# Altium PCB 8_1000M_Switch_VT1.1.PcbDoc (part 2 of 3)
Units mil, origin at the board's own origin, x right, y up, seen from the top; angles counter-clockwise.
Board outline 6257.04 x 4516.14 mil, 2 copper layers (Top Layer, Bottom Layer); 180 components, 239 nets, 766 pads, 500 vias.
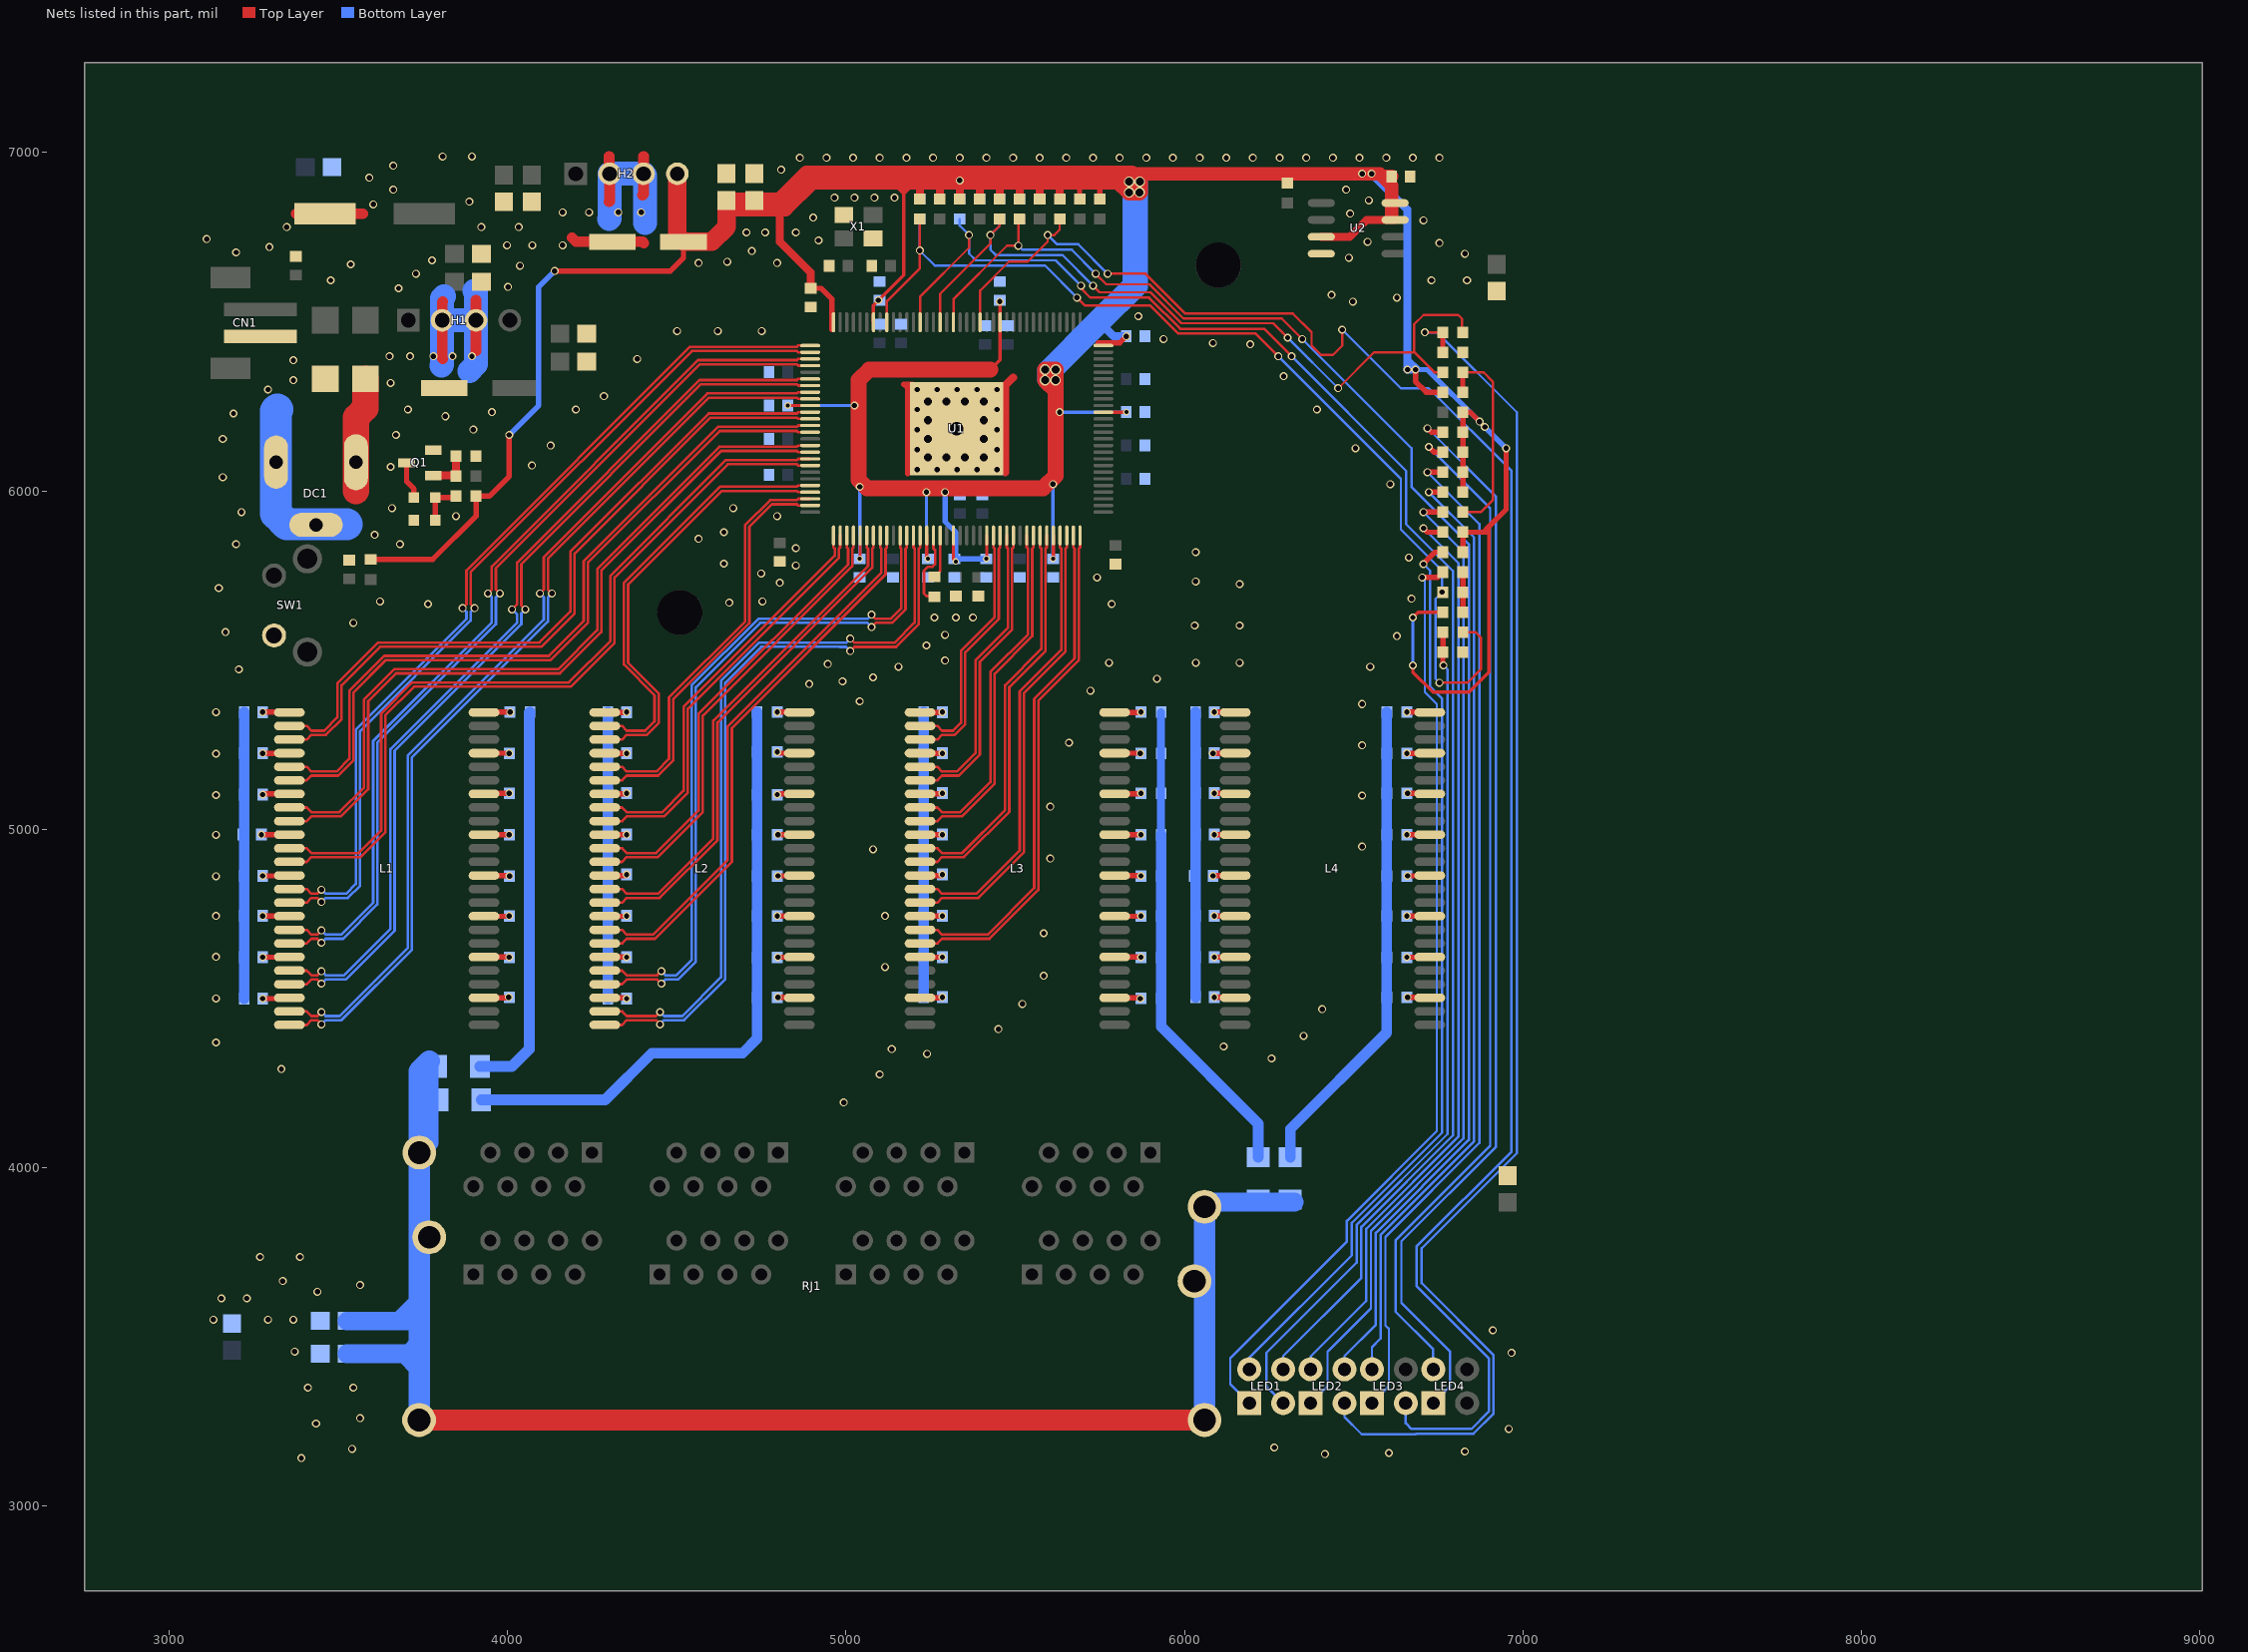
[diagram p2: the nets of this part, all layers, seen from the top]

## Via types
v1: diameter 23.62, hole 15.75, Top Layer to Bottom Layer, 457 vias
v2: diameter 31.5, hole 23.62, Top Layer to Bottom Layer, 28 vias
v3: diameter 19.68, hole 11.81, Top Layer to Bottom Layer, 15 vias

## Nets (pads, with @x,y where several pads share a name; then routed paths per layer and width w, separated by ;. In a path a pad name is that pad's centre, name@x,y a point inside that pad or via, vN(x,y) a via of type N, cw(c..) or ccw(c..) an arc to the next point about the centre after c; other vN are vias at no path point) (continued)
3.3V: C39.2 C46.2 C47.2 C48.1 C52.2 C53.2 C54.2 C55.2 C56.2 C57.2 C58.2 C59.2 C60.2 C61.2 C81.2 H2.4 R33.1 R35.1 R37.1 R38.1 R39.1 R40.1 R41.2 R42.2 R44.2 R45.2 R46.2 R49.2 R50.2 R51.2 R52.2 R53.2 R54.1 R57.1 R63.1 R67.2 R68.2 R69.2 R70.2 U1.5 U1.15 U1.19 U1.24 U1.34 U1.54 U1.64 U1.77 U1.96 U1.102 U1.112 U2.3 U2.7 U2.8 | length 15878
  Top Layer w9.84: v3(4827.9,6252.36) 4893.81,6252.36 U1.112@4893.93,6252.48 ; v3(5040.5,5799.61) 5041.57,5800.67 U1.5@5041.57,5868.62 ; U1.96@5080.94,6498.54 5080.94,6548.7 v1(5095.62,6563.39) 5170.42,6638.19 5170.42,6877.97 5170.61,6878.16 ; 5118.86,6937.4 5142.48,6913.78 5142.48,6906.29 5170.61,6878.16 ; 5152.26,6913.78 5174.36,6891.68 ; 5179.91,6913.78 5174.36,6908.23 5174.36,6891.68 ; 5206.23,6913.78 5174.36,6881.91 ; U1.15@5238.42,5868.62 5238.42,5802.48 v3(5241.29,5799.61) ; U1.19@5317.16,5868.62 5317.16,5798.54 v3(5323.96,5791.73) ; v3(5414.52,5799.61) 5415.58,5800.67 U1.24@5415.58,5868.62 ; 5426.33,6358.66 5454.95,6387.28 U1.77@5454.95,6498.54 5454.95,6558.39 v1(5453.89,6559.45) ; v3(5611.37,5799.61) 5612.43,5800.67 U1.34@5612.43,5868.62 ; U1.54@5760.07,6232.79 5827.79,6232.79 v3(5827.9,6232.68) ; v1(6674.36,5484.65) 6674.36,5464.96 6733.41,5405.91 6839.71,5405.91 6898.77,5464.96 6898.77,5894.1 ; v1(6674.36,5626.38) 6690.11,5642.13 R63.1@6762.81,5642.13 ; 5170.61,6878.16 5174.36,6881.91 ; 5174.36,6881.91 5164.58,6891.68 5174.36,6891.68
  Top Layer w15.75: R42.2@3595.62,5797.77 3778.82,5797.77 3906.91,5925.86 R54.1@3906.91,5984.65 3946.01,5984.65 4005.07,6043.7 v1(4005.07,6165.75) ; v1(4138.92,6650) 4481.44,6650 4519.64,6688.19 C48.1@4519.64,6736.62 ; C46.2@4729.48,6835.04 C46.2@4729.48,6858.66 ; 4804.28,6835.04 4804.28,6858.66 ; C53.2@4894.83,6598.82 4926.33,6598.82 4957.82,6567.32 4957.82,6476.77 ; 5324.34,6913.78 v1@5328.28,6917.72 ; R69.2@5690.1,6862.72 5690.1,6913.78 5690.1,6935.64 5691.86,6937.4 ; 5744.61,6913.78 5749.16,6909.24 R68.2@5749.16,6862.72 ; 5745.22,6437.4 5808.22,6437.4 v1(5827.9,6457.09) ; v1(6682.23,6358.66) 6682.23,6323.23 6713.73,6291.73 R57.1@6762.54,6291.73 ; R33.1@6822.13,5819.29 R35.1@6822.13,5878.35 6883.02,5878.35 ; R37.1@6822.13,5996.46 R38.1@6822.13,6055.51 R39.1@6822.13,6114.57 R40.1@6822.13,6173.62 R67.2@6822.13,6232.68 6843.65,6232.68 v1(6871.21,6205.12) ; 6896.86,5878.35 6883.02,5878.35 ; v1(6949.95,6126.38) 6949.95,5945.28 6898.77,5894.1 6883.02,5878.35
  Top Layer w23.62: 4804.28,6835.04 4804.28,6736.62 4894.83,6646.06 C53.2@4894.83,6598.82 ; 5206.23,6913.78 5217.67,6902.35 R52.2@5217.67,6862.86 ; 5265.29,6913.78 5276.72,6902.35 R50.2@5276.72,6862.86 ; 5324.34,6913.78 5335.78,6902.35 R51.2@5335.78,6862.86 ; 5383.4,6913.78 5394.83,6902.35 R53.2@5394.83,6862.86 ; 5442.46,6913.78 5453.89,6902.35 R49.2@5453.89,6862.86 ; 5501.51,6915.35 5503.08,6913.78 5512.94,6903.92 R46.2@5512.94,6864.44 ; 5560.57,6913.78 5572,6902.35 R45.2@5572,6862.86 ; 5619.62,6913.78 5631.05,6902.35 R44.2@5631.05,6862.86 ; U2.3@6403.97,6750.99 6487.94,6750.99 6537.94,6800.99 U2.7@6621.91,6800.99 U2.7@6611.37,6811.53 ; 6611.37,6901.97 C39.2@6611.37,6929.53
  Top Layer w39.37: 5844.11,6937.4 v1(6524.75,6937.4) v1(6552.31,6937.4) 6575.93,6937.4 6583.81,6929.53 ; U2.7@6611.37,6811.53 6611.37,6901.97 6583.81,6929.53 ; C39.2@6611.37,6929.53 6583.81,6929.53
  Top Layer w47.24: 5426.33,6358.66 5068.06,6358.66 5036.56,6327.17 5036.56,6033.47 5061.76,6008.27 5582.23,6008.27 5619.24,6045.28 5619.24,6295.67 ; 5619.24,6295.67 v2(5619.24,6358.66) v2(5587.74,6358.66) v2(5587.74,6327.17) 5619.24,6295.67 ; C47.2@4646.8,6833.21 4648.63,6835.04 4729.48,6835.04 4804.28,6835.04 4820.03,6835.04 4898.77,6913.78 5142.48,6913.78 5152.26,6913.78 5179.91,6913.78 5206.23,6913.78 5265.29,6913.78 5324.34,6913.78 5383.4,6913.78 5442.46,6913.78 5503.08,6913.78 5560.57,6913.78 5690.1,6913.78 5744.61,6913.78 5804.74,6913.78 v2(5836.23,6882.29) v2(5867.27,6882.29) 5867.73,6882.74 v2(5867.73,6913.78) 5844.11,6937.4 5691.86,6937.4 5118.86,6937.4 4883.02,6937.4 4804.28,6858.66 C46.2@4729.48,6858.66 C47.2@4646.8,6858.66 C47.2@4646.8,6833.21
  Top Layer w55.12: H2.4@4501.52,6937.4 4501.52,6754.73 C48.1@4519.64,6736.62 4603.49,6736.62 4646.8,6779.92 C47.2@4646.8,6833.21
  Bottom Layer w9.84: v3(4827.9,6252.36) v1(5024.75,6252.36) ; v3(5040.5,5799.61) v1(5040.5,6012.21) ; v1(5095.62,6563.39) C54.2@5099.56,6559.45 ; v1(5237.35,5996.46) 5237.35,5803.54 v3(5241.29,5799.61) ; v3(5611.37,5799.61) v1(5611.37,6020.08) ; v1(5631.05,6232.68) v3(5827.9,6232.68) ; 5738.17,6509.09 5755.88,6491.37 ; v1(6674.36,5484.65) v1(6674.36,5626.38)
  Bottom Layer w15.75: v1(4005.07,6165.75) 4091.68,6252.36 4091.68,6602.76 v1(4138.92,6650) ; v1(5292.47,5996.46) 5292.47,5909.84 5323.96,5878.35 C58.2@5323.96,5799.61 ; C58.2@5320.03,5799.61 C58.2@5323.96,5799.61 ; v3(5323.96,5791.73) C58.2@5323.96,5799.61 ; R70.2@5335.77,6862.72 v1(5335.77,6917.72) ; v3(5414.52,5799.61) C58.2@5323.96,5799.61 ; 6658.61,6391.6 v1@6691.55,6358.66 ; v1(6682.23,6358.66) v1@6691.55,6358.66 ; v1@6949.95,6126.38 v1(6886.96,6189.37) v1(6871.21,6205.12) 6717.67,6358.66 v1@6691.55,6358.66
  Bottom Layer w23.62: 5755.88,6491.37 5790.16,6457.09 v1(5827.9,6457.09) ; v1(6524.75,6937.4) v1(6552.31,6937.4) 6658.61,6831.1 6658.61,6391.6 v1(6658.61,6358.66) v1(6682.23,6358.66)
  Bottom Layer w47.24: v2(5587.74,6327.17) v2(5587.74,6358.66) 5738.17,6509.09 5839.71,6610.63 5839.71,6878.81 v2(5836.23,6882.29) v2(5836.23,6913.78) v2(5867.73,6913.78) 5867.73,6603.22 5755.88,6491.37 5623.18,6358.66 v2(5619.24,6358.66) 5619.24,6327.62 v2(5618.78,6327.17) v2(5587.74,6327.17)
$1N104220: R43.1 U1.17 | length 129
  Top Layer w7.87: R43.1@5260.97,5746.59 5277.79,5763.4 U1.17@5277.79,5868.62
$1N185587: R36.1 R57.2 R59.2 | length 612.6
  Top Layer w7.09: R36.1@6822.13,5937.4 6875.15,5937.4 6910.58,5972.84 6910.58,6323.23 6883.02,6350.79 R59.2@6822.13,6350.79
  Top Layer w15.75: R57.2@6821.86,6291.73 6821.86,6350.52 R59.2@6822.13,6350.79
$1N185642: LED2.2 R58.1 R60.1 | length 4172.9
  Top Layer w7.09: v1(6709.79,6468.9) R60.1@6762.81,6468.9
  Top Layer w15.75: R58.1@6762.81,6409.84 R60.1@6762.81,6468.9
  Bottom Layer w7.09: LED2.2@6472.39,3304.72 6472.39,3263.75 6523.15,3212.99 6682.23,3212.99 6683.81,3214.57 6853.46,3214.57 6912.94,3274.05 6912.94,3446.85 6699.95,3659.84 6699.95,3762.2 6981.45,4043.7 6981.45,6232.68 6745.23,6468.9 v1(6709.79,6468.9)
$1N185934: R34.1 R63.2 R64.2 | length 118.1
  Top Layer w15.75: R63.2@6822.13,5642.13 R64.2@6822.13,5701.18 R34.1@6822.13,5760.24
$1N185939: LED1.2 R65.1 R66.1 | length 2526.7
  Top Layer w15.75: R66.1@6763.07,5583.07 6763.07,5524.28 R65.1@6762.81,5524.02 6762.81,5486.75 v1(6764.91,5484.65)
  Bottom Layer w7.09: LED1.2@6291.29,3304.72 6241.29,3354.72 6241.29,3453.15 6508.06,3719.92 6508.06,3831.38 6776.72,4100.04 6776.72,5472.84 v1(6764.91,5484.65)
$3N11717: L1.42 R3.1 | length 75.5
  Top Layer w15.75: L1.42@3930.26,5104.93 3932.02,5106.69 v1(4005.07,5106.69)
$3N11718: L1.39 R4.1 | length 74.9
  Top Layer w15.75: L1.39@3930.26,4984.43 4004.85,4984.43 v1(4005.07,4984.65)
$3N11719: L1.36 R5.1 | length 76.2
  Top Layer w15.75: L1.36@3930.26,4863.93 4004.18,4863.93 v1(4005.79,4862.32)
$3N11720: L1.33 R6.1 | length 75.2
  Top Layer w15.75: L1.33@3930.26,4743.43 4004.01,4743.43 v1(4005.07,4744.49)
$3N11721: L1.30 R7.1 | length 75
  Top Layer w15.75: L1.30@3930.26,4623.03 4004.47,4623.03 v1(4005.07,4622.44)
$3N11722: L1.27 R8.1 | length 73.7
  Top Layer w15.75: L1.27@3930.26,4502.53 4001.43,4502.53 v1(4003.23,4504.33)
$3N11723: L2.48 R9.1 | length 65.6
  Top Layer w15.75: v1(4796.67,5346.85) 4860.82,5346.85 L2.48@4861.83,5345.83
$3N11724: L2.45 R10.1 | length 66.6
  Top Layer w15.75: v1(4796.67,5228.74) 4800.08,5225.33 L2.45@4861.83,5225.33
$3N11725: L2.42 R11.1 | length 66.1
  Top Layer w15.75: v1(4796.67,5102.76) 4798.85,5104.93 L2.42@4861.83,5104.93
$3N11726: L2.39 R12.1 | length 63.4
  Top Layer w15.75: v1(4798.51,4984.65) 4861.62,4984.65 L2.39@4861.83,4984.43
$3N11727: L2.36 R13.1 | length 63.9
  Top Layer w15.75: v1(4798.51,4862.6) 4860.5,4862.6 L2.36@4861.83,4863.93
$3N11728: L2.33 R14.1 | length 65.6
  Top Layer w15.75: v1(4796.67,4744.49) 4860.78,4744.49 L2.33@4861.83,4743.43
$3N11729: L2.30 R15.1 | length 63.6
  Top Layer w15.75: v1(4798.51,4622.44) 4861.24,4622.44 L2.30@4861.83,4623.03
$3N11730: L2.27 R16.1 | length 64.1
  Top Layer w15.75: v1(4798.51,4504.33) 4860.04,4504.33 L2.27@4861.83,4502.53
$3N11731: L3.48 R17.1 | length 78.3
  Top Layer w15.75: L3.48@5793.29,5345.83 5870.19,5345.83 v1(5871.21,5346.85)
$3N11732: L3.45 R18.1 | length 76.3
  Top Layer w15.75: L3.45@5793.29,5225.33 5868.84,5225.33 v1(5869.37,5224.8)
$3N11733: L3.42 R19.1 | length 78.6
  Top Layer w15.75: L3.42@5793.29,5104.93 5869.45,5104.93 v1(5871.21,5106.69)
$3N11734: L3.39 R20.1 | length 78
  Top Layer w15.75: L3.39@5793.29,4984.43 5871,4984.43 v1(5871.21,4984.65)
$3N11735: L3.36 R21.1 | length 78.5
  Top Layer w15.75: L3.36@5793.29,4863.93 5869.87,4863.93 v1(5871.21,4862.6)
$3N11736: L3.33 R22.1 | length 78.4
  Top Layer w15.75: L3.33@5793.29,4743.43 5870.15,4743.43 v1(5871.21,4744.49)
$3N11737: L3.30 R23.1 | length 78.2
  Top Layer w15.75: L3.30@5793.29,4623.03 5870.62,4623.03 v1(5871.21,4622.44)
$3N11738: L3.27 R24.1 | length 77
  Top Layer w15.75: L3.27@5793.29,4502.53 5867.23,4502.53 v1(5869.37,4500.39)
$3N11739: L4.48 R25.1 | length 68
  Top Layer w15.75: v1(6656.78,5346.85) 6723.38,5346.85 L4.48@6724.4,5345.83
$3N11740: L4.45 R26.1 | length 67.8
  Top Layer w15.75: v1(6656.78,5224.8) 6723.87,5224.8 L4.45@6724.4,5225.33
$3N11741: L4.42 R27.1 | length 66.5
  Top Layer w15.75: v1(6658.61,5106.69) 6722.64,5106.69 L4.42@6724.4,5104.93
$3N11742: L4.39 R28.1 | length 67.7
  Top Layer w15.75: v1(6656.78,4984.65) 6724.18,4984.65 L4.39@6724.4,4984.43
$3N11743: L4.36 R29.1 | length 66.3
  Top Layer w15.75: v1(6658.61,4862.6) 6723.06,4862.6 L4.36@6724.4,4863.93
$3N11744: L4.33 R30.1 | length 68.1
  Top Layer w15.75: v1(6656.78,4744.49) 6723.34,4744.49 L4.33@6724.4,4743.43
$3N11745: L4.30 R31.1 | length 67.9
  Top Layer w15.75: v1(6656.78,4622.44) 6723.8,4622.44 L4.30@6724.4,4623.03
$3N11746: L4.27 R32.1 | length 66.5
  Top Layer w15.75: v1(6658.61,4504.33) 6722.6,4504.33 L4.27@6724.4,4502.53
$3N11843: L1.48 R1.1 | length 77.7
  Top Layer w15.75: L1.48@3930.26,5345.83 3931.01,5346.58 v1(4007.63,5346.58)
$3N11844: L1.45 R2.1 | length 75
  Top Layer w15.75: L1.45@3930.26,5225.33 4004.54,5225.33 v1(4005.07,5224.8)
$3N11846: M.1 R1.2 R2.2 R3.2 R4.2 R5.2 R6.2 R7.2 R8.2 | length 1164.4
  Bottom Layer w31.5: M.1@3917.87,4299.61 4012.94,4299.61 4064.39,4351.05 R8.2@4064.39,4504.33 R7.2@4064.39,4622.44 R6.2@4064.39,4744.49 R5.2@4064.39,4862.6 R4.2@4064.39,4984.65 R3.2@4064.39,5106.69 R2.2@4064.39,5224.8 4064.39,5345.02 R1.2@4066.22,5346.85
$3N11848: C2.1 R17.2 R18.2 R19.2 R20.2 R21.2 R22.2 R23.2 R24.2 | length 1434.5
  Bottom Layer w23.62: R20.2@5930.53,4984.65 R19.2@5930.53,5106.69 R18.2@5930.53,5224.8 R17.2@5930.53,5346.85
  Bottom Layer w31.5: R20.2@5930.53,4984.65 R21.2@5930.53,4862.6 R22.2@5930.53,4744.49 R23.2@5930.53,4622.44 R24.2@5930.53,4500.39 5930.53,4417.45 6217.67,4130.32 C2.1@6217.67,4031.31
$3N11849: C5.2 L1.1 | length 79.2
  Top Layer w15.75: v1(3276.72,5346.85) 3354.45,5346.85 L1.1@3355.46,5345.83
$3N11850: C6.2 L1.4 | length 79
  Top Layer w15.75: v1(3276.72,5224.8) 3354.93,5224.8 L1.4@3355.46,5225.33
$3N11851: C7.2 L1.7 | length 79.6
  Top Layer w15.75: v1(3276.72,5102.76) 3278.9,5104.93 L1.7@3355.46,5104.93
$3N11852: C8.2 L1.10 | length 82.8
  Top Layer w15.75: v1(3272.78,4984.65) 3355.25,4984.65 L1.10@3355.46,4984.43
$3N11853: C9.2 L1.13 | length 79.3
  Top Layer w15.75: v1(3276.72,4862.6) 3354.13,4862.6 L1.13@3355.46,4863.93
$3N11854: C10.2 L1.16 | length 79.2
  Top Layer w15.75: v1(3276.72,4744.49) 3354.41,4744.49 L1.16@3355.46,4743.43
$3N11855: C11.2 L1.19 | length 79
  Top Layer w15.75: v1(3276.72,4622.44) 3354.87,4622.44 L1.19@3355.46,4623.03
$3N11856: C12.2 L1.22 | length 79.6
  Top Layer w15.75: v1(3276.72,4500.39) 3353.32,4500.39 L1.22@3355.46,4502.53
$3N11857: C13.2 L2.1 | length 64.9
  Top Layer w15.75: L2.1@4287.03,5345.83 4350.51,5345.83 v1(4351.52,5346.85)
$3N11858: C14.2 L2.4 | length 64.7
  Top Layer w15.75: L2.4@4287.03,5225.33 4287.56,5224.8 v1(4351.52,5224.8)
$3N11859: C15.2 L2.7 | length 65.2
  Top Layer w15.75: L2.7@4287.03,5104.93 4349.76,5104.93 v1(4351.52,5106.69)
$3N11860: C16.2 L2.10 | length 64.6
  Top Layer w15.75: L2.10@4287.03,4984.43 4287.25,4984.65 v1(4351.52,4984.65)
$3N11861: C17.2 L2.13 | length 65.6
  Top Layer w15.75: L2.13@4287.03,4863.93 4348.92,4863.93 v1(4351.52,4866.54)
$3N11862: C18.2 L2.16 | length 64.9
  Top Layer w15.75: L2.16@4287.03,4743.43 4350.47,4743.43 v1(4351.52,4744.49)
$3N11863: C19.2 L2.19 | length 64.7
  Top Layer w15.75: L2.19@4287.03,4623.03 4350.93,4623.03 v1(4351.52,4622.44)
$3N11864: C20.2 L2.22 | length 65.4
  Top Layer w15.75: L2.22@4287.03,4502.53 4349.38,4502.53 v1(4351.52,4500.39)
$3N11865: C21.2 L3.1 | length 66.5
  Top Layer w15.75: L3.1@5218.49,5345.83 5283.58,5345.83 v1(5284.59,5346.85)
$3N11866: C22.2 L3.4 | length 66.3
  Top Layer w15.75: L3.4@5218.49,5225.33 5219.02,5224.8 v1(5284.59,5224.8)
$3N11867: C23.2 L3.7 | length 66.8
  Top Layer w15.75: L3.7@5218.49,5104.93 5282.83,5104.93 v1(5284.59,5106.69)
$3N11868: C24.2 L3.10 | length 66.2
  Top Layer w15.75: L3.10@5218.49,4984.43 5284.38,4984.43 v1(5284.59,4984.65)
$3N11869: C25.2 L3.13 | length 67.2
  Top Layer w15.75: L3.13@5218.49,4863.93 5281.99,4863.93 v1(5284.59,4866.54)
$3N11870: C26.2 L3.16 | length 66.5
  Top Layer w15.75: L3.16@5218.49,4743.43 5219.55,4744.49 v1(5284.59,4744.49)
$3N11871: C27.2 L3.19 | length 66.3
  Top Layer w15.75: L3.19@5218.49,4623.03 5219.08,4622.44 v1(5284.59,4622.44)
$3N11872: C28.2 L3.22 | length 66.8
  Top Layer w15.75: L3.22@5218.49,4502.53 5282.8,4502.53 v1(5284.59,4504.33)
$3N11873: C29.2 L4.1 | length 62.3
  Top Layer w15.75: v1(6087.75,5346.85) 6148.58,5346.85 L4.1@6149.6,5345.83
$3N11874: C30.2 L4.4 | length 66
  Top Layer w15.75: v1(6083.81,5224.8) 6149.07,5224.8 L4.4@6149.6,5225.33
$3N11875: C31.2 L4.7 | length 62.6
  Top Layer w15.75: v1(6087.75,5106.69) 6147.83,5106.69 L4.7@6149.6,5104.93
$3N11876: C32.2 L4.10 | length 61.9
  Top Layer w15.75: v1(6087.75,4984.65) 6149.38,4984.65 L4.10@6149.6,4984.43
$3N11877: C33.2 L4.13 | length 66.3
  Top Layer w15.75: v1(6083.81,4862.6) 6085.14,4863.93 L4.13@6149.6,4863.93
$3N11878: C34.2 L4.16 | length 62.3
  Top Layer w15.75: v1(6087.74,4744.49) 6148.54,4744.49 L4.16@6149.6,4743.43
$3N11879: C35.2 L4.19 | length 62.1
  Top Layer w15.75: v1(6087.75,4622.44) 6149,4622.44 L4.19@6149.6,4623.03
$3N11880: C36.2 L4.22 | length 62.6
  Top Layer w15.75: v1(6087.75,4504.33) 6147.8,4504.33 L4.22@6149.6,4502.53
$3N11884: C4.2 R9.2 R10.2 R11.2 R12.2 R13.2 R14.2 R15.2 R16.2 | length 1854.8
  Bottom Layer w31.5: C4.2@3922.1,4201.18 4288.53,4201.18 4426.33,4338.98 4694.04,4338.98 4737.35,4382.28 R16.2@4737.35,4504.33 R15.2@4737.35,4622.44 R14.2@4737.35,4744.49 R13.2@4737.35,4862.6 R12.2@4737.35,4984.65 R11.2@4737.35,5102.76 R10.2@4737.35,5228.74 R9.2@4737.35,5346.85
$3N11885: C80.2 R25.2 R26.2 R27.2 R28.2 R29.2 R30.2 R31.2 R32.2 | length 1433.7
  Bottom Layer w31.5: C80.2@6312.15,4031.31 6312.15,4114.57 6597.46,4399.87 R32.2@6597.46,4504.33 R31.2@6597.46,4622.44 R30.2@6597.46,4744.49 R29.2@6597.46,4862.6 R28.2@6597.46,4984.65 R27.2@6597.46,5106.69 R26.2@6597.46,5224.8 R25.2@6597.46,5346.85
$4N785: D1.2 DC1.1 | length 342.1
  Top Layer w78.74: 3552.31,6000.39 DC1.1@3552.3,6085.12 3552.3,6216.92 3579.87,6244.49 D1.2@3579.87,6331.11
$4N2923: Q1.1 R55.2 R56.2 | length 126.8
  Top Layer w23.62: Q1.1@3780.66,6045.67 3845.62,6045.67 R55.2@3847.59,6043.7 R56.2@3847.59,6102.76
$4N2951: LED6.1 Q1.3 | length 111.7
  Top Layer w15.75: Q1.3@3701.92,6083.07 3701.92,6027.95 3723.53,6006.34 LED6.1@3723.53,5980.31
$4N2979: LED5.2 LED6.2 R54.2 | length 129.7
  Top Layer w15.75: LED5.2@3786.53,5913.58 LED6.2@3786.53,5980.51 3843.45,5980.51 R54.2@3847.59,5984.65
CGND: C2.2 C4.1 C80.1 C83.2 C84.2 M.2 RJ1.1 RJ1.2 RJ1.3 RJ1.4 RJ1.5 RJ1.6 | length 5222.3
  Top Layer w62.99: RJ1.3@3738.57,3255 RJ1.6@6058.97,3255
  Bottom Layer w55.12: C83.2@3525.68,3450.96 3694.65,3450.96 ; C84.2@3525.68,3547.8 3680.57,3547.8 ; 3719.88,3565.36 3737.44,3547.8 ; 3739.27,3406.34 3694.65,3450.96 ; 3739.27,3447.11 3735.42,3450.96 3707.86,3450.96 ; 3739.27,3482.37 3707.86,3450.96 ; 3739.27,3545.97 3737.44,3547.8 ; 3739.27,3606.49 3680.57,3547.8 ; RJ1.1@3739.27,4045 3769.14,4074.87 M.2@3769.14,4315.65 ; RJ1.4@6058.97,3885 6072.58,3898.62 C80.1@6323.97,3898.62 ; 3680.57,3547.8 3737.44,3547.8 ; 3694.65,3450.96 3707.86,3450.96
  Bottom Layer w62.99: RJ1.3@3738.57,3255 3739.27,3255.7 3739.27,3406.34 3739.27,3447.11 3739.27,3482.37 3739.27,3545.97 3739.27,3606.49 RJ1.1@3739.27,4045 3739.27,4285.78 M.2@3769.14,4315.65 ; RJ1.6@6058.97,3255 RJ1.4@6058.97,3885
GND: C3.1 C5.1 C6.1 C7.1 C8.1 C9.1 C10.1 C11.1 C12.1 C13.1 C14.1 C15.1 C16.1 C17.1 C18.1 C19.1 C20.1 C21.1 C22.1 C23.1 C24.1 C25.1 C26.1 C27.1 C28.1 C29.1 C30.1 C31.1 C32.1 C33.1 C34.1 C35.1 C36.1 C37.1 C38.2 C39.1 C40.1 C41.1 C42.1 C43.1 C44.1 C45.1 C46.1 C47.1 C48.2 C49.2 C50.2 C51.1 C52.1 C53.1 C54.1 C55.1 C56.1 C57.1 C58.1 C59.1 C60.1 C61.1 C62.1 C63.1 C64.1 C65.1 C66.1 C67.1 C68.1 C69.1 C70.1 C71.1 C72.1 C73.1 C74.1 C75.1 C76.1 C77.1 C78.1 C79.1 C81.1 C82.1 C83.1 C84.1 C85.1 C86.1 C87.1 CN1.1 D2.2 DC1.2 DC1.3 H1.2 H1.3 H2.2 H2.3 LED5.1 pad.1 Q1.2 R43.2 R47.1 R48.1 R56.1 R58.2 R61.1 R62.1 R65.2 SW1.2 U1.16 U1.129 U2.4 X1.2 X1.4 | length 6926.6
  Top Layer w7.87: U1.16@5258.1,5868.62 5258.1,5830.04 5262.82,5825.31 5262.82,5783.86 5254.95,5775.99 5241.29,5775.99 5229.93,5764.63 5229.93,5696.79 5237.35,5689.37 5258.87,5689.37 R43.2@5260.97,5687.27
  Top Layer w15.75: 5182.23,6051.58 5182.23,6303.54 5170.42,6315.36 5195.22,6315.36 pad.1@5327,6183.58
  Top Layer w23.62: 5469.63,6055.51 5469.63,6311.42 5493.26,6335.04
  Top Layer w31.5: C50.2@3375.14,6819.29 3572,6819.29 ; 3808.22,6390.16 3806.64,6391.73 H1.2@3806.64,6504.33 3806.64,6557.88 3808.22,6559.45 ; 3906.64,6413.78 H1.3@3906.64,6504.33 3906.64,6563.39 ; 4190.11,6748.43 4201.92,6736.62 C48.2@4309.4,6736.62 4398.77,6736.62 4402.7,6732.68 ; 4300.34,6854.73 4301.52,6855.91 H2.2@4301.52,6937.4 4300.34,6938.58 4300.34,6988.58 ; 4398.77,6874.41 4401.52,6877.17 H2.3@4401.52,6937.4 4401.52,6988.58
  Bottom Layer w31.5: C12.1@3221.6,4500.39 C11.1@3221.6,4622.44 C10.1@3221.6,4744.49 C9.1@3221.6,4862.6 C7.1@3221.6,5102.76 C6.1@3221.6,5224.8 C5.1@3221.6,5346.85 ; C20.1@4296.4,4500.39 C19.1@4296.4,4622.44 C18.1@4296.4,4744.49 C17.1@4296.4,4866.54 C16.1@4296.4,4984.65 C15.1@4296.4,5106.69 C14.1@4296.4,5224.8 C13.1@4296.4,5346.85 ; C28.1@5229.47,4504.33 C27.1@5229.47,4622.44 C26.1@5229.47,4744.49 C25.1@5229.47,4866.54 C24.1@5229.47,4984.65 C23.1@5229.47,5106.69 C22.1@5229.47,5224.8 C21.1@5229.47,5346.85 ; C36.1@6032.63,4504.33 C35.1@6032.63,4622.44 C34.1@6032.63,4744.49 C32.1@6032.63,4984.65 C31.1@6032.63,5106.69 C30.1@6032.63,5224.8 C29.1@6032.63,5346.85
  Bottom Layer w70.87: 3804.28,6370.47 3806.64,6372.84 H1.2@3806.64,6504.33 ; 3812.15,6575.2 3806.64,6569.69 H1.2@3806.64,6504.33 ; 3886.96,6354.73 3906.64,6374.41 H1.3@3906.64,6504.33 ; 3902.7,6590.95 3906.64,6587.01 H1.3@3906.64,6504.33 ; 4300.34,6803.55 4301.52,6804.73 H2.2@4301.52,6937.4 H2.3@4401.52,6937.4 4406.64,6932.29 4406.64,6791.73 ; H1.2@3806.64,6504.33 H1.3@3906.64,6504.33
  Bottom Layer w78.74: v2(5241.29,6209.06) 5266.76,6183.58 pad.1@5327,6183.58
  Bottom Layer w94.49: 3320.03,6240.55 3316.1,6236.63 DC1.2@3316.1,6085.12 3316.1,5933.46 3347.59,5901.97 3524.75,5901.97
  other v1: 3390.89,3142.13 6414.52,3153.94 6603.51,3157.62 6827.9,3161.81 3540.5,3169.68 6264.91,3173.62 6957.82,3228.74 3434.2,3244.49 3564.12,3260.24 3410.58,3350.79 3544.44,3350.79 6965.7,3453.15 3371.21,3457.09 6910.58,3520.08 3131.05,3551.57 3292.47,3551.57 3367.27,3551.57 3154.67,3614.57 3229.48,3614.57 3438.14,3634.25 3564.12,3653.94 3335.77,3665.75 3268.85,3736.61 3386.96,3736.61 4993.26,4193.31 5099.56,4275.98 3331.84,4291.73 6257.04,4323.23 5239.5,4336.83 5134.99,4350.79 6115.3,4358.66 3138.92,4370.47 6351.52,4390.16 5449.95,4409.84 6406.64,4468.9 5520.82,4484.65 3138.92,4500.74 5583.81,4567.32 5115.3,4593.72 3138.92,4623.62 5583.81,4693.31 3138.92,4744.45 5115.3,4744.49 3138.92,4861.83 5603.49,4913.78 5079.87,4941.34 6524.75,4949.21 3138.92,4984.03 5603.49,5067.32 6524.75,5100.05 3138.92,5101.42 3138.92,5223.61 6524.75,5248.43 5658.61,5256.3 3138.92,5346.85 6524.75,5370.47 5040.5,5378.35 5721.6,5409.84 4890.89,5429.53 4989.32,5437.4 5918.45,5445.28 5079.87,5449.21 3205.85,5472.84 5154.67,5480.71 6548.37,5480.71 4946.01,5488.58 5776.72,5492.52 6033.05,5492.52 6162.55,5492.52 5292.47,5498.87 5237.35,5543.7 6627.12,5571.26 5292.47,5575.2 3166.48,5583.07 6029.96,5602.76 6162.55,5602.76 3544.44,5610.63 5260.97,5626.38 5324.23,5626.38 5375.15,5626.38 3764.91,5665.75 5784.6,5665.75 4654.67,5669.69 3623.18,5673.62 4753.1,5673.62 6670.42,5681.5 3146.8,5712.99 6162.55,5724.8 4804.28,5728.74 6032.63,5732.68 5741.29,5744.49 4749.16,5756.3 4851.52,5779.92 4638.93,5785.44 6662.55,5803.54 6032.63,5819.29 4851.52,5831.1 3197.98,5842.91 3682.23,5842.91 4564.12,5858.66 3607.43,5870.47 4638.93,5878.35 3847.59,5925.59 4796.41,5925.59 3213.73,5937.4 3658.61,5949.21 4666.48,5949.21 6607.43,6020.08 3158.61,6040.96 5209.79,6063.39 5268.85,6063.39 5327.9,6063.39 5386.96,6063.39 5446.01,6063.39 3654.67,6071.26 4072,6075.2 5209.79,6122.44 5446.01,6122.44 6505.07,6126.38 4127.11,6134.25 3158.61,6153.94 3670.42,6165.75 3898.77,6181.5 5209.79,6181.5 5446.01,6181.5 3816.09,6220.87 3190.11,6228.74 3953.89,6232.68 3705.85,6240.55 4201.92,6240.55 5209.79,6240.55 5446.01,6240.55 6390.89,6240.55 4284.59,6279.92 3292.47,6299.61 5209.79,6299.61 5268.85,6299.61 5327.9,6299.61 5386.96,6299.61 5446.01,6299.61 3654.67,6319.29 3367.27,6327.17 6292.47,6338.98 3367.27,6386.22 4383.02,6390.16 3651.09,6398.03 3711.95,6398.03 3780.6,6398.03 3837.35,6398.03 3894.83,6398.03 6194.04,6433.47 6083.81,6437.4 5938.14,6449.21 4501.13,6472.84 4621,6472.84 4750.75,6472.84 5863.34,6516.14 6497.19,6559.45 6627.12,6571.26 6434.2,6579.14 3678.29,6598.82 4001.13,6602.76 3477.51,6622.44 6729.48,6622.44 6834.3,6622.35 3729.48,6642.13 4036.56,6665.75 3536.56,6669.69 4564.12,6673.62 4796.41,6673.62 4648.86,6677.56 3776.72,6681.5 6485.38,6689.37 6827.9,6701.18 3197.98,6705.12 4721.6,6709.06 3296.4,6720.87 3998.34,6726.05 4073.17,6726.05 4162.41,6726.05 6753.1,6732.68 6540.5,6736.62 4918.45,6740.55 3111.37,6744.49 4705.85,6764.17 4760.97,6764.17 4851.52,6764.17 3347.59,6779.92 3922.39,6779.92 4032.66,6779.92 6705.86,6799.61 4902.7,6807.48 6489.32,6819.29 4162.41,6823.23 4240.67,6823.23 4327.17,6823.23 4394.83,6823.23 3603.49,6846.85 3886.96,6854.73 6544.44,6858.66 4965.7,6866.54 5024.75,6866.54 5083.81,6866.54 5142.86,6866.54 3662.55,6890.16 6477.51,6890.16 3591.68,6925.59 4808.22,6949.21 3662.55,6961.03 4863.33,6984.65 4942.07,6984.65 5020.82,6984.65 5099.56,6984.65 5178.3,6984.65 5257.04,6984.65 5335.78,6984.65 5414.52,6984.65 5493.26,6984.65 5572,6984.65 5650.74,6984.65 5729.48,6984.65 5808.22,6984.65 5886.96,6984.65 5965.7,6984.65 6044.44,6984.65 6123.18,6984.65 6201.92,6984.65 6280.66,6984.65 6359.4,6984.65 6438.14,6984.65 6516.88,6984.65 6595.62,6984.65 6674.36,6984.65 6753.1,6984.65 3808.22,6988.58 3894.83,6988.58
  other v2: 5241.29,6098.82 5296.41,6098.82 5351.52,6098.82 5406.64,6098.82 5241.29,6153.94 5406.64,6153.94 5406.64,6209.06 5241.29,6264.17 5296.41,6264.17 5351.52,6264.17 5406.64,6264.17
LED0: LED1.1 R34.2 | length 2801.2
  Top Layer w15.75: v1(6701.92,5744.49) 6747.06,5744.49 R34.2@6762.81,5760.24
  Bottom Layer w7.09: LED1.1@6191.29,3304.72 6134.99,3361.02 6134.99,3437.4 6479.66,3782.07 6479.66,3843.14 6745.23,4108.71 6745.23,5370.47 6709.79,5405.91 6709.79,5736.62 v1(6701.92,5744.49)
LED1: LED1.3 R33.2 | length 2710.8
  Top Layer w15.75: v1(6705.86,5783.86) 6705.86,5785.96 6739.19,5819.29 R33.2@6762.81,5819.29
  Bottom Layer w7.09: LED1.3@6191.29,3404.72 6191.29,3438.58 6493.86,3741.15 6493.86,3837.26 6760.97,4104.37 6760.97,5386.22 6725.54,5421.65 6725.54,5764.17 v1(6705.86,5783.86)
LED2: LED2.1 R36.2 | length 2925.6
  Top Layer w15.75: v1(6705.86,5937.4) R36.2@6762.81,5937.4
  Bottom Layer w7.09: LED2.1@6372.39,3304.72 6422.39,3354.72 6422.39,3457.09 6550.66,3585.35 6550.66,3813.73 6823.97,4087.04 6823.97,5819.29 v1(6705.86,5937.4)
LED3: LED2.3 R35.2 | length 2771.5
  Top Layer w15.75: v1(6705.86,5890.16) 6717.67,5878.35 R35.2@6762.81,5878.35
  Bottom Layer w7.09: LED2.3@6372.39,3404.72 6372.39,3442.52 6536.46,3606.59 6536.46,3819.61 6809.79,4092.95 6809.79,5786.22 v1(6705.86,5890.16)
LED4: LED3.1 R38.2 | length 2999.6
  Top Layer w15.75: v1(6717.67,6055.51) R38.2@6762.81,6055.51
  Bottom Layer w7.09: LED3.1@6553.49,3304.72 6603.49,3354.72 6603.49,3524.02 6593.26,3534.25 6593.26,3796.08 6871.21,4074.04 6871.21,5901.97 v1(6717.67,6055.51)
LED5: LED3.3 R37.2 | length 2813.5
  Top Layer w15.75: v1(6721.6,5996.46) 6733.41,5996.46 R37.2@6762.81,5996.46
  Bottom Layer w7.09: LED3.3@6553.49,3404.72 6553.49,3470.08 6579.06,3495.64 6579.06,3801.97 6855.46,4078.37 6855.46,5862.6 v1(6721.6,5996.46)
LED6: LED4.1 R40.2 | length 3210.7
  Top Layer w15.75: v1(6717.67,6185.43) 6729.48,6173.62 R40.2@6762.81,6173.62
  Bottom Layer w7.09: v1(6717.67,6185.43) 6920.03,5983.07 6920.03,4062.61 6640.5,3783.08 6640.5,3601.18 6784.6,3457.09 6784.6,3354.72 LED4.1@6734.6,3304.72
LED7: LED4.3 R39.2 | length 3010.3
  Top Layer w15.75: v1(6721.6,6130.32) 6737.35,6114.57 R39.2@6762.81,6114.57
  Bottom Layer w7.09: v1(6721.6,6130.32) 6902.71,5949.21 6902.71,4065.37 6623.18,3785.84 6623.18,3575.2 6734.6,3463.78 LED4.3@6734.6,3404.72
P0A_N: L1.15 U1.104 | length 2586.4
  Top Layer w7.76: L1.15@3355.46,4783.63 3406.64,4783.63 3420.6,4797.59 3438.14,4797.59 v1(3450.18,4785.54) ; v1(3902.7,5653.94) 3890.89,5665.75 3890.89,5760.24 4544.32,6413.66 4854.82,6413.66 4858.52,6409.96 U1.104@4893.93,6409.96
  Bottom Layer w7.76: v1(3450.18,4785.54) 3462.23,4797.59 3528.3,4797.59 3564.12,4833.42 3564.12,5290.11 3890.89,5616.88 3890.89,5642.13 v1(3902.7,5653.94)
P0A_P: L1.14 U1.103 | length 2586
  Top Layer w7.76: L1.14@3355.46,4823.83 3406.64,4823.83 3420.6,4809.88 3438.14,4809.88 v1(3450.18,4821.92) ; v1(3867.27,5653.94) 3878.6,5665.27 3878.6,5765.32 4539.23,6425.95 4854.82,6425.95 4858.52,6429.65 U1.103@4893.93,6429.65
  Bottom Layer w7.76: v1(3450.18,4821.92) 3462.23,4809.88 3523.21,4809.88 3551.82,4838.49 3551.82,5295.18 3878.59,5621.95 3878.59,5642.62 v1(3867.27,5653.94)
P0B_N: L1.18 U1.106 | length 2645.4
  Top Layer w7.76: L1.18@3355.46,4663.13 3406.64,4663.13 3420.6,4677.09 3438.14,4677.09 v1(3450.18,4665.04) ; v1(3977.51,5697.25) 3965.7,5709.06 3965.7,5772.05 4567.94,6374.29 4854.82,6374.29 4858.52,6370.59 U1.106@4893.93,6370.59
  Bottom Layer w7.76: v1(3450.18,4665.04) 3462.23,4677.09 3514.1,4677.09 3615.3,4778.3 3615.3,5256.3 3965.7,5606.69 3965.7,5685.43 v1(3977.51,5697.25)
P0B_P: L1.17 U1.105 | length 2645
  Top Layer w7.76: L1.17@3355.46,4703.33 3406.64,4703.33 3420.6,4689.38 3438.14,4689.38 v1(3450.18,4701.42) ; v1(3942.07,5697.25) 3953.41,5708.58 3953.41,5777.13 4562.85,6386.58 4854.82,6386.58 4858.52,6390.28 U1.105@4893.93,6390.28
  Bottom Layer w7.76: v1(3450.18,4701.42) 3462.23,4689.38 3509.01,4689.38 3603,4783.37 3603,5261.39 3953.4,5611.79 3953.4,5685.92 v1(3942.07,5697.25)
P0C_N: L1.21 U1.109 | length 2709.1
  Top Layer w7.76: L1.21@3355.46,4542.73 3406.64,4542.68 3420.6,4556.64 3438.14,4556.64 v1(3450.18,4544.59) ; v1(4052.31,5650) 4040.5,5661.81 4040.5,5783.86 4571.88,6315.24 4854.82,6315.24 4858.52,6311.54 U1.109@4893.93,6311.54
  Bottom Layer w7.76: v1(3450.18,4544.59) 3462.23,4556.64 3521.97,4556.64 3666.48,4701.16 3666.48,5232.68 4040.5,5606.69 4040.5,5638.19 v1(4052.31,5650)
P0C_P: L1.20 U1.108 | length 2712
  Top Layer w7.76: L1.20@3355.46,4582.88 3406.64,4582.88 3420.6,4568.93 3438.14,4568.93 v1(3450.18,4580.97) ; v1(4012.94,5650) 4028.2,5665.26 4028.2,5788.93 4566.79,6327.52 4854.82,6327.52 4858.52,6331.22 U1.108@4893.93,6331.22
  Bottom Layer w7.76: v1(3450.18,4580.97) 3462.23,4568.93 3516.88,4568.93 3654.18,4706.23 3654.18,5237.77 4028.2,5611.79 4028.2,5634.74 v1(4012.94,5650)
P0D_N: L1.24 U1.111 | length 2769
  Top Layer w7.76: L1.24@3355.46,4422.23 3406.64,4422.18 3420.6,4436.14 3438.14,4436.14 v1(3450.18,4424.09) ; v1(4131.05,5697.25) 4119.24,5709.06 4119.24,5799.61 4595.5,6275.87 4854.82,6275.87 4858.52,6272.17 U1.111@4893.93,6272.17
  Bottom Layer w7.76: v1(3450.18,4424.09) 3462.23,4436.14 3509.37,4436.14 3717.66,4644.44 3717.66,5212.99 4119.24,5614.57 4119.24,5685.43 v1(4131.05,5697.25)
P0D_P: L1.23 U1.110 | length 2768.6
  Top Layer w7.76: L1.23@3355.46,4462.38 3406.64,4462.38 3420.6,4448.43 3438.14,4448.43 v1(3450.18,4460.47) ; v1(4095.62,5697.25) 4106.94,5708.57 4106.94,5804.68 4590.41,6288.15 4854.82,6288.15 4858.52,6291.85 U1.110@4893.93,6291.85
  Bottom Layer w7.76: v1(3450.18,4460.47) 3462.23,4448.43 3504.28,4448.43 3705.36,4649.51 3705.36,5218.09 4106.94,5619.66 4106.94,5685.92 v1(4095.62,5697.25)
P0LED0: R52.1 R62.2 R64.1 R66.2 U1.94 | length 3086.9
  Top Layer w7.09: v1(5682.23,6571.26) 5705.85,6547.64 5898.77,6547.64 5981.45,6464.96 6209.79,6464.96 v1(6276.72,6398.03) ; v1(6753.1,5433.47) 6835.78,5433.47 6875.15,5472.84 6875.15,5567.32 6859.4,5583.07 R66.2@6822.39,5583.07 ; v1(6760.97,5701.18) R64.1@6762.81,5701.18
  Top Layer w7.87: U1.94@5120.31,6498.54 5120.31,6560.52 5217.67,6657.88 v1(5217.67,6710.32) R52.1@5217.67,6791.47
  Bottom Layer w7.09: R62.2@5217.66,6803.4 v1(5217.67,6710.32) 5262.24,6665.75 5587.74,6665.75 v1(5682.23,6571.26) ; v1(6276.72,6398.03) 6638.93,6035.83 6638.93,5886.22 6760.97,5764.17 v1(6760.97,5701.18) 6741.29,5681.5 6741.29,5445.28 v1(6753.1,5433.47)
P1A_N: L1.3 U1.114 | length 2096.4
  Top Layer w7.76: L1.3@3355.46,5265.53 3406.64,5265.53 3420.6,5279.49 3462.91,5279.49 3509.48,5326.06 3509.48,5426.06 3623.18,5539.76 4099.55,5539.76 4197.98,5638.19 4197.98,5815.36 4599.44,6216.81 4854.82,6216.81 4858.52,6213.11 U1.114@4893.93,6213.11
P1A_P: L1.2 U1.113 | length 2096.4
  Top Layer w7.76: L1.2@3355.46,5305.73 3406.64,5305.73 3420.6,5291.78 3457.82,5291.78 3497.19,5331.15 3497.19,5431.15 3618.11,5552.06 4094.46,5552.06 4185.68,5643.28 4185.68,5820.43 4594.35,6229.1 4854.82,6229.1 4858.52,6232.8 U1.113@4893.93,6232.8
P1B_N: L1.6 U1.116 | length 2189
  Top Layer w7.76: L1.6@3355.46,5145.03 3406.64,5145.03 3420.6,5158.99 3499.93,5158.99 3544.91,5203.97 3544.91,5404.76 3640.55,5500.39 4127.11,5500.39 4237.35,5610.63 4237.35,5787.8 4627,6177.44 4854.82,6177.44 4858.52,6173.74 U1.116@4893.93,6173.74
P1B_P: L1.5 U1.115 | length 2189
  Top Layer w7.76: L1.5@3355.46,5185.23 3406.64,5185.23 3420.6,5171.28 3494.84,5171.28 3532.63,5209.06 3532.63,5409.84 3635.48,5512.69 4122.02,5512.69 4225.05,5615.73 4225.05,5792.87 4621.91,6189.73 4854.82,6189.73 4858.52,6193.43 U1.115@4893.93,6193.43
P1C_N: L1.9 U1.119 | length 2251.3
  Top Layer w7.76: L1.9@3355.46,5024.63 3406.64,5024.63 3420.55,5038.54 3507.78,5038.54 3588.22,5118.98 3588.22,5378.82 3670.42,5461.02 4154.67,5461.02 4277.21,5583.56 4277.21,5764.66 4630.93,6118.39 4854.82,6118.39 4858.52,6114.69 U1.119@4893.93,6114.69
P1C_P: L1.8 U1.118 | length 2251.3
  Top Layer w7.76: L1.8@3355.46,5064.73 3406.64,5064.73 3420.55,5050.83 3502.67,5050.83 3575.93,5124.09 3575.93,5383.91 3665.35,5473.32 4149.58,5473.32 4264.91,5588.66 4264.91,5769.73 4625.85,6130.67 4854.82,6130.67 4858.52,6134.37 U1.118@4893.93,6134.37
P1D_N: L1.12 U1.121 | length 2342.3
  Top Layer w7.76: L1.12@3355.46,4904.13 3406.64,4904.13 3420.55,4918.04 3565.6,4918.04 3638.92,4991.37 3638.92,5337.35 3723.23,5421.65 4186.17,5421.65 4316.09,5551.58 4316.09,5744.49 4650.62,6079.02 4854.82,6079.02 4858.52,6075.32 U1.121@4893.93,6075.32
P1D_P: L1.11 U1.120 | length 2342.3
  Top Layer w7.76: L1.11@3355.46,4944.23 3406.64,4944.23 3420.55,4930.33 3560.51,4930.33 3626.64,4996.46 3626.64,5342.44 3718.15,5433.95 4181.07,5433.95 4303.79,5556.67 4303.79,5749.56 4645.53,6091.3 4854.82,6091.3 4858.52,6095 U1.120@4893.93,6095
P1LED0: LED1.4 R70.1 U1.89 | length 4912.5
  Top Layer w7.09: U1.89@5218.73,6498.54 5218.73,6574.29 5363.33,6718.9 v1(5363.33,6756.3) ; v1(5694.04,6606.69) 5694.04,6598.82 5721.6,6571.26 5895.23,6571.26 5987.33,6479.16 6234.96,6479.16 v1(6316.09,6398.03)
  Bottom Layer w7.09: R70.1@5335.77,6803.4 5335.77,6783.87 v1(5363.33,6756.3) 5363.33,6701.18 5383.02,6681.5 5619.24,6681.5 v1(5694.04,6606.69) ; LED1.4@6291.29,3404.72 6291.29,3444.09 6522.26,3675.06 6522.26,3825.49 6792.47,4095.71 6792.47,5764.17 6654.67,5901.97 6654.67,6059.45 v1(6316.09,6398.03)
P2A_N: L2.3 U1.125 | length 1280.6
  Top Layer w7.76: L2.3@4287.03,5265.53 4338.21,5265.53 4352.17,5279.49 4411.77,5279.49 4446.48,5314.2 4446.48,5401.5 4355.95,5492.03 4355.95,5723.65 4632.58,6000.28 4854.82,6000.28 4858.52,5996.58 U1.125@4893.93,5996.58
P2A_P: L2.2 U1.124 | length 1280.7
  Top Layer w7.76: L2.2@4287.03,5305.73 4338.21,5305.73 4352.17,5291.78 4406.68,5291.78 4434.2,5319.29 4434.2,5396.39 4343.65,5486.94 4343.65,5728.74 4627.47,6012.56 4854.82,6012.56 4858.52,6016.26 U1.124@4893.93,6016.26
P2B_N: L2.6 U1.127 | length 1219.5
  Top Layer w7.76: L2.6@4287.03,5145.03 4338.21,5145.03 4352.17,5158.99 4444.81,5158.99 4489.31,5203.49 4489.32,5384.58 4714.22,5609.47 4714.22,5894.58 4780.54,5960.91 4854.82,5960.91 4858.52,5957.21 U1.127@4893.93,5957.21
P2B_P: L2.5 U1.126 | length 1219.5
  Top Layer w7.76: L2.5@4287.03,5185.23 4338.21,5185.23 4352.17,5171.28 4439.73,5171.28 4477.01,5208.56 4477,5389.65 4701.92,5614.57 4701.92,5899.66 4775.45,5973.19 4854.82,5973.19 4858.52,5976.89 U1.126@4893.93,5976.89
P2C_N: L2.9 U1.2 | length 1226.5
  Top Layer w7.76: L2.9@4287.03,5024.63 4338.21,5024.63 4352.12,5038.54 4462.16,5038.54 4532.63,5109.01 4532.63,5357.02 4978.81,5803.2 4978.81,5829.52 4982.51,5833.22 U1.2@4982.51,5868.62
P2C_P: L2.8 U1.1 | length 1206.1
  Top Layer w7.76: L2.8@4287.03,5064.73 4338.21,5064.73 4352.12,5050.83 4457.07,5050.83 4520.33,5114.08 4520.33,5362.11 4966.52,5808.31 4966.52,5829.52 4962.83,5833.22 U1.1@4962.83,5868.62
P2D_N: L2.12 U1.4 | length 1352.7
  Top Layer w7.76: L2.12@4287.03,4904.13 4338.21,4904.13 4352.12,4918.04 4444.02,4918.04 4576.84,5050.86 4576.84,5335.95 5018.18,5777.28 5018.18,5829.52 5021.88,5833.22 U1.4@5021.88,5868.62
P2D_P: L2.11 U1.3 | length 1332.3
  Top Layer w7.76: L2.11@4287.03,4944.23 4338.21,4944.23 4352.12,4930.33 4438.93,4930.33 4564.54,5055.93 4564.54,5341.04 5005.89,5782.4 5005.89,5829.52 5002.2,5833.22 U1.3@5002.2,5868.62
P2LED0: R48.2 R49.1 R59.1 R60.2 U1.86 | length 2337.1
  Top Layer w7.09: U1.86@5277.79,6498.54 5277.79,6582.17 5426.33,6730.71 v1(5426.33,6756.3) 5453.89,6783.86 R49.1@5453.89,6803.55 ; v1(5729.48,6606.69) 5749.16,6587.01 5899.56,6587.01 5990.9,6495.67 6261.76,6495.67 v1(6304.28,6453.15) ; v1(6453.89,6303.54) 6560.19,6409.84 6674.23,6409.84 ; R59.1@6762.81,6350.79 6737.35,6350.79 6678.3,6409.84 6674.23,6409.84 ; R60.2@6822.13,6468.9 6820.03,6471 6820.03,6508.27 6808.22,6520.08 6705.86,6520.08 6678.17,6492.39 6678.17,6413.78 6674.23,6409.84
  Bottom Layer w7.09: R48.2@5453.89,6803.55 5453.89,6783.86 v1(5426.33,6756.3) 5426.33,6712.99 5442.08,6697.25 5638.93,6697.25 v1(5729.48,6606.69) ; v1(6304.28,6453.15) v1(6453.89,6303.54)
P3A_N: L2.14 U1.6 | length 1480.5
  Top Layer w7.76: L2.14@4287.03,4823.83 4338.21,4823.83 4352.17,4809.88 4444.47,4809.88 4607.43,4972.84 4607.43,5320.94 5064.95,5778.46 5064.95,5829.51 5061.25,5833.22 U1.6@5061.25,5868.62
P3A_P: L2.15 U1.7 | length 1500.9
  Top Layer w7.76: L2.15@4287.03,4783.63 4338.21,4783.63 4352.17,4797.59 4449.56,4797.59 4619.71,4967.75 ; 4619.73,4967.75 4619.73,5315.84 5077.23,5773.35 5077.23,5829.51 5080.94,5833.22 U1.7@5080.94,5868.62
P3B_N: L2.18 U1.9 | length 1629.3
  Top Layer w7.76: L2.18@4287.03,4663.13 4338.21,4663.13 4352.17,4677.09 4435.35,4677.09 4662.55,4904.29 4662.55,5299.61 5116.6,5753.66 5116.6,5829.51 5120.31,5833.22 U1.9@5120.31,5868.62
P3B_P: L2.17 U1.8 | length 1609
  Top Layer w7.76: L2.17@4287.03,4703.33 4338.21,4703.33 4352.17,4689.38 4430.26,4689.38 4650.25,4909.36 4650.25,5304.68 5104.32,5758.75 5104.32,5829.51 5100.62,5833.22 U1.8@5100.62,5868.62
P3C_N: L2.21 U1.12 | length 2063
  Top Layer w7.76: L2.21@4287.03,4542.73 4338.21,4542.73 4352.12,4556.64 4442.07,4556.64 v1(4454.32,4544.4) ; v1(5075.5,5597.91) 5087.74,5610.16 5136.14,5610.16 5175.66,5649.68 5175.66,5829.52 5179.36,5833.22 U1.12@5179.36,5868.62
  Bottom Layer w7.76: v1(4454.32,4544.4) 4466.56,4556.64 4503.88,4556.64 4556.25,4609.01 4556.25,5420.01 4746.4,5610.16 5063.26,5610.16 v1(5075.5,5597.91)
P3C_P: L2.20 U1.11 | length 2042.6
  Top Layer w7.76: L2.20@4287.03,4582.83 4338.21,4582.83 4352.12,4568.93 4442.07,4568.93 v1(4454.32,4581.17) ; v1(5075.5,5634.69) 5087.74,5622.44 5131.05,5622.44 5163.37,5654.76 5163.37,5829.52 5159.68,5833.22 U1.11@5159.68,5868.62
  Bottom Layer w7.76: v1(4454.32,4581.17) 4466.56,4568.93 4498.79,4568.93 4543.95,4614.08 4543.95,5425.1 4741.29,5622.44 5063.26,5622.44 v1(5075.5,5634.69)
P3D_N: L2.24 U1.14 | length 2211.6
  Top Layer w7.76: L2.24@4287.03,4422.23 4338.21,4422.23 4352.12,4436.14 4438.14,4436.14 v1(4450.18,4424.09) ; v1(5012.51,5527.05) 5024.75,5539.29 5147.95,5539.29 5215.03,5606.37 5215.03,5829.52 5218.73,5833.22 U1.14@5218.73,5868.62
  Bottom Layer w7.76: v1(4450.18,4424.09) 4462.23,4436.14 4521.18,4436.14 4642.85,4557.82 4642.86,5433.47 4749.16,5539.76 4977.51,5539.76 ; 4981.44,5539.29 5000.26,5539.29 v1(5012.51,5527.05)
P3D_P: L2.23 U1.13 | length 2191.2
  Top Layer w7.76: L2.23@4287.03,4462.33 4338.21,4462.33 4352.12,4448.43 4438.14,4448.43 v1(4450.18,4460.47) ; v1(5012.51,5563.82) 5024.75,5551.58 5142.86,5551.58 5202.74,5611.46 5202.74,5829.52 5199.05,5833.22 U1.13@5199.05,5868.62
  Bottom Layer w7.76: v1(4450.18,4460.47) 4462.23,4448.43 4516.09,4448.43 4630.57,4562.91 4630.56,5438.54 4744.07,5552.05 4977.51,5552.05 ; 4981.44,5551.58 5000.26,5551.58 v1(5012.51,5563.82)
P3LED0: LED2.4 R46.1 U1.84 | length 4758.9
  Top Layer w7.09: U1.84@5317.16,6498.54 5317.16,6566.42 5475.54,6724.8 v1(5509,6724.8) 5509,6799.61 R46.1@5512.94,6803.55 ; v1(5737.35,6642.13) 5768.85,6610.63 5896.02,6610.63 5996.78,6509.87 6286.93,6509.87 v1(6347.59,6449.21)
  Bottom Layer w7.09: v1(5509,6724.8) 5520.82,6712.99 5666.48,6712.99 v1(5737.35,6642.13) ; v1(6347.59,6449.21) 6670.42,6126.38 6670.42,6012.21 6839.71,5842.91 6839.71,4082.71 6564.86,3807.85 6564.86,3536.56 6472.39,3444.09 LED2.4@6472.39,3404.72
P4A_N: L3.3 U1.26 | length 753
  Top Layer w7.76: L3.3@5218.49,5265.53 5269.67,5265.53 5283.63,5279.49 5321.22,5279.49 5352,5310.27 5352,5522.87 5451.25,5622.12 5451.25,5829.52 5454.95,5833.22 U1.26@5454.95,5868.62
P4A_P: L3.2 U1.25 | length 732.7
  Top Layer w7.76: L3.2@5218.49,5305.73 5269.67,5305.73 5283.63,5291.78 5316.13,5291.78 5339.71,5315.36 5339.71,5527.95 5438.96,5627.2 5438.96,5829.52 5435.27,5833.22 U1.25@5435.27,5868.62
P4B_N: L3.6 U1.28 | length 896.7
  Top Layer w7.76: L3.6@5218.49,5145.03 5269.67,5145.03 5283.63,5158.99 5332.96,5158.99 5395.3,5221.34 5395.3,5495.28 5490.62,5590.6 5490.62,5829.52 5494.32,5833.22 U1.28@5494.32,5868.62
P4B_P: L3.5 U1.27 | length 876.3
  Top Layer w7.76: L3.5@5218.49,5185.23 5269.67,5185.23 5283.63,5171.28 5327.84,5171.28 5383.02,5226.45 5383.02,5500.39 5478.33,5595.71 5478.33,5829.52 5474.64,5833.22 U1.27@5474.64,5868.62
P4C_N: L3.9 U1.31 | length 1047.2
  Top Layer w7.76: L3.9@5218.49,5024.63 5269.67,5024.63 5283.58,5038.54 5342.43,5038.54 5438.63,5134.74 5438.63,5459.89 5549.67,5570.93 5549.67,5829.51 5553.38,5833.22 U1.31@5553.38,5868.62
P4C_P: L3.8 U1.30 | length 1026.8
  Top Layer w7.76: L3.8@5218.49,5064.73 5269.67,5064.73 5283.58,5050.83 5337.32,5050.83 5426.33,5139.84 5426.33,5464.96 5537.39,5576.02 5537.39,5829.51 5533.69,5833.22 U1.30@5533.69,5868.62
P4D_N: L3.12 U1.33 | length 1187.2
  Top Layer w7.76: L3.12@5218.49,4904.13 5269.67,4904.13 5283.58,4918.04 5347.91,4918.04 5481.93,5052.06 5481.93,5420.52 5589.04,5527.63 5589.04,5829.51 5592.75,5833.22 U1.33@5592.75,5868.62
P4D_P: L3.11 U1.32 | length 1166.8
  Top Layer w7.76: L3.11@5218.49,4944.23 5269.67,4944.23 5283.58,4930.33 5342.8,4930.33 5469.63,5057.16 5469.63,5425.59 5576.76,5532.72 5576.76,5829.51 5573.06,5833.22 U1.32@5573.06,5868.62
P4LED0: LED3.2 R44.1 U1.80 | length 5534.5
  Top Layer w7.09: U1.80@5395.9,6498.54 5395.9,6592.01 5481.45,6677.56 5536.56,6677.56 5595.62,6736.62 v1(5595.62,6756.3) 5615.3,6756.3 5631.05,6772.05 R44.1@5631.05,6803.55 ; v1(5772.78,6642.13) 5884.61,6642.13 6002.66,6524.07 6319.97,6524.07 6375.15,6468.9 6375.15,6429.53 6402.71,6401.97 6438.14,6401.97 6465.7,6429.53 v1(6465.7,6476.77)
  Bottom Layer w7.09: v1(5595.62,6756.3) 5623.18,6728.74 5686.17,6728.74 v1(5772.78,6642.13) ; v1(6465.7,6476.77) 6638.93,6303.54 6721.6,6303.54 6965.7,6059.45 6965.7,4048.03 6685.01,3767.34 6685.01,3651.16 6898.77,3437.4 6898.77,3279.92 6847.59,3228.74 6670.42,3228.74 6653.49,3245.67 LED3.2@6653.49,3304.72
P5A_N: L3.15 U1.36 | length 1357.1
  Top Layer w7.76: L3.15@5218.49,4783.63 5269.67,4783.63 5283.63,4797.59 5390.5,4797.59 5525.22,4932.31 5525.22,5402.44 5648.1,5525.31 5648.1,5829.52 5651.8,5833.22 U1.36@5651.8,5868.62
P5A_P: L3.14 U1.35 | length 1336.7
  Top Layer w7.76: L3.14@5218.49,4823.83 5269.67,4823.83 5283.63,4809.88 5385.41,4809.88 5512.94,4937.4 5512.94,5407.53 5635.81,5530.4 5635.81,5829.52 5632.12,5833.22 U1.35@5632.12,5868.62
P5B_N: L3.18 U1.38 | length 1513.2
  Top Layer w7.76: L3.18@5218.49,4663.13 5269.67,4663.13 5283.63,4677.09 5423.54,4677.09 5568.06,4821.61 5568.06,5380.66 5687.47,5500.07 5687.47,5829.52 5691.17,5833.22 U1.38@5691.17,5868.62
P5B_P: L3.17 U1.37 | length 1492.9
  Top Layer w7.76: L3.17@5218.49,4703.33 5269.67,4703.33 5283.63,4689.38 5418.45,4689.37 5555.76,4826.68 5555.76,5385.73 5675.18,5505.16 5675.18,5829.52 5671.49,5833.22 U1.37@5671.49,5868.62